# Altium PCB PCB1.pcbdoc
Units mil, origin at the board's own origin, x right, y up, seen from the top; angles counter-clockwise.
Board outline 3045 x 3700 mil, 2 copper layers (Top Layer, Bottom Layer), stack 62.206 mil thick; 58 components, 52 nets, 178 pads, 29 vias.
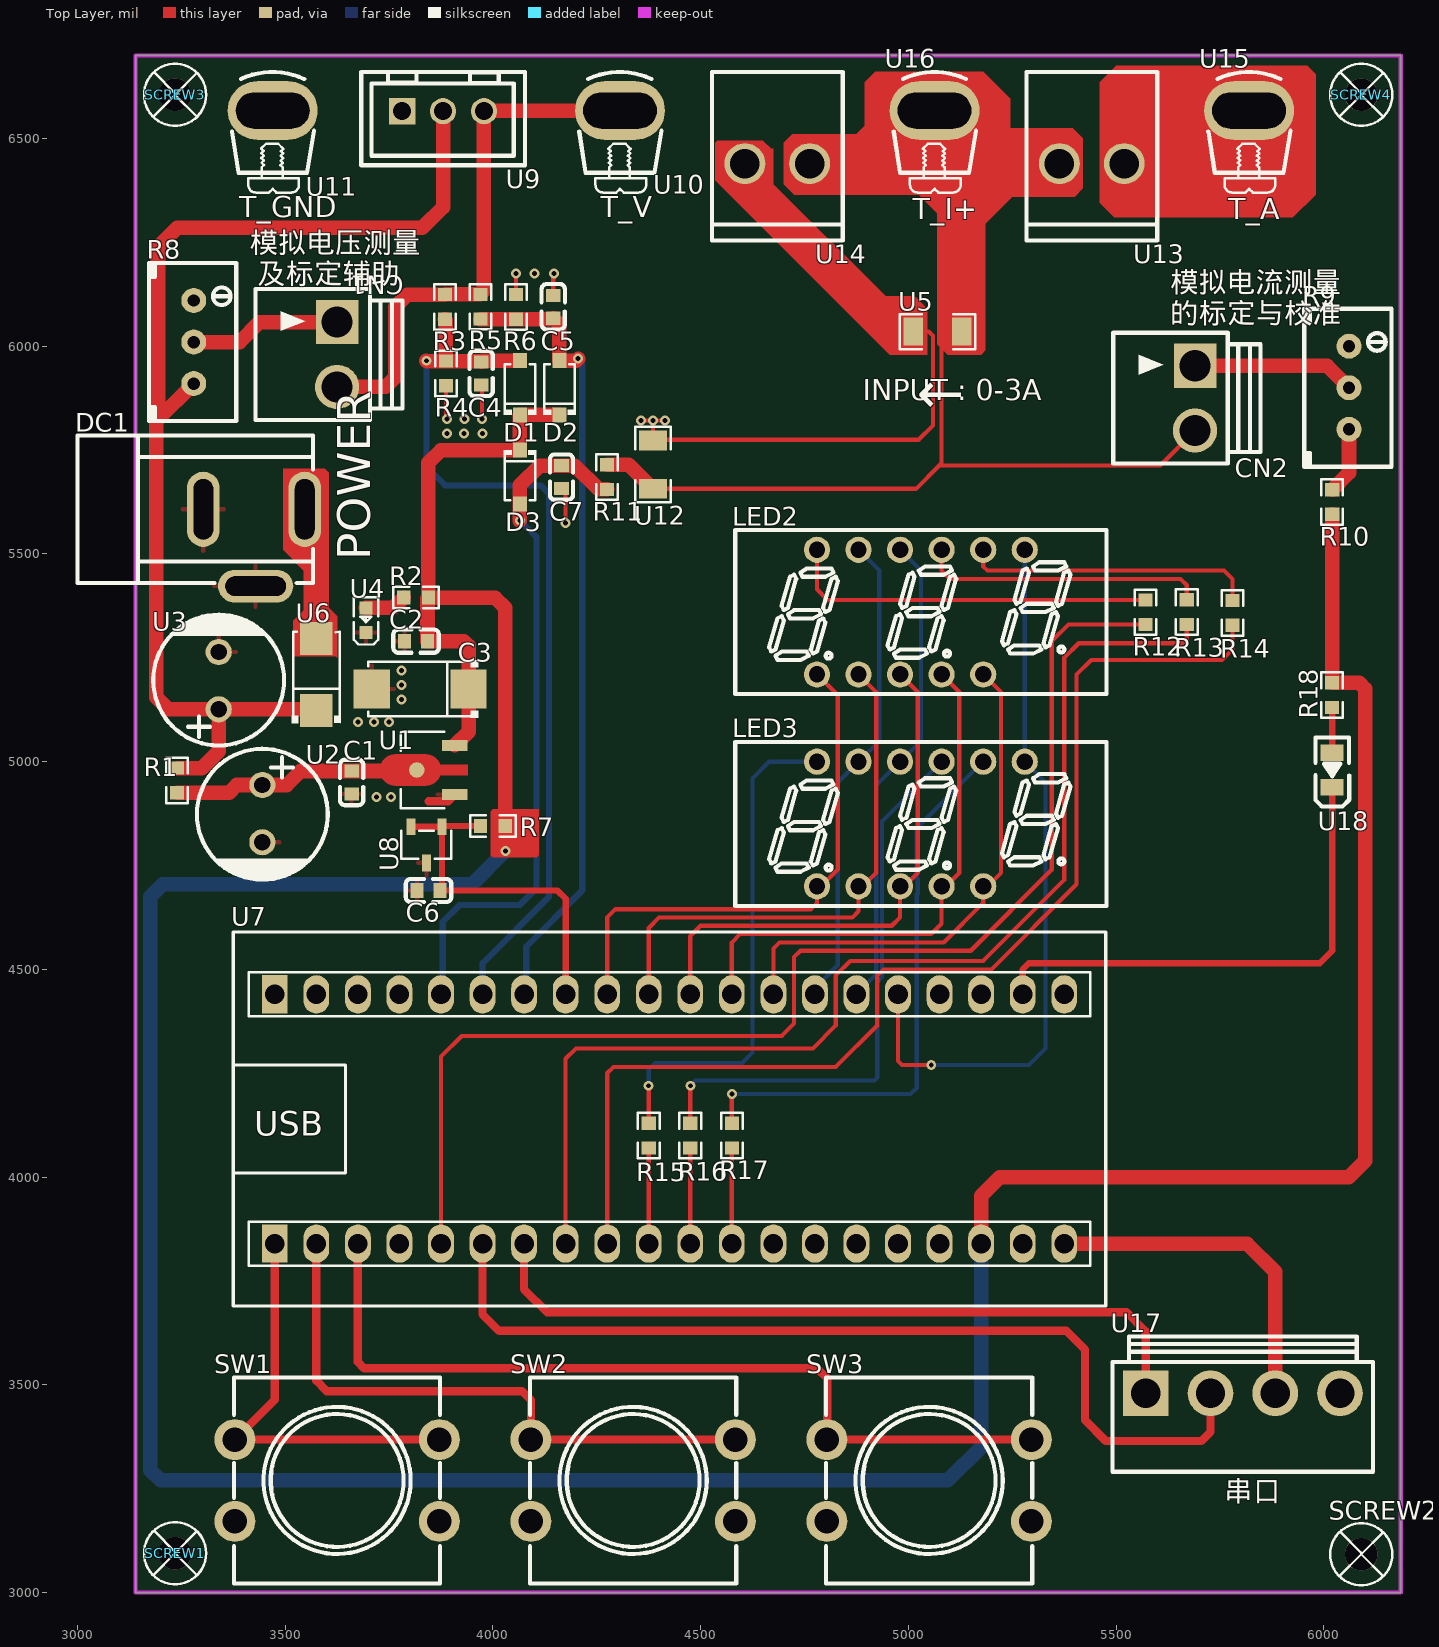
[diagram p0: Top Layer view]
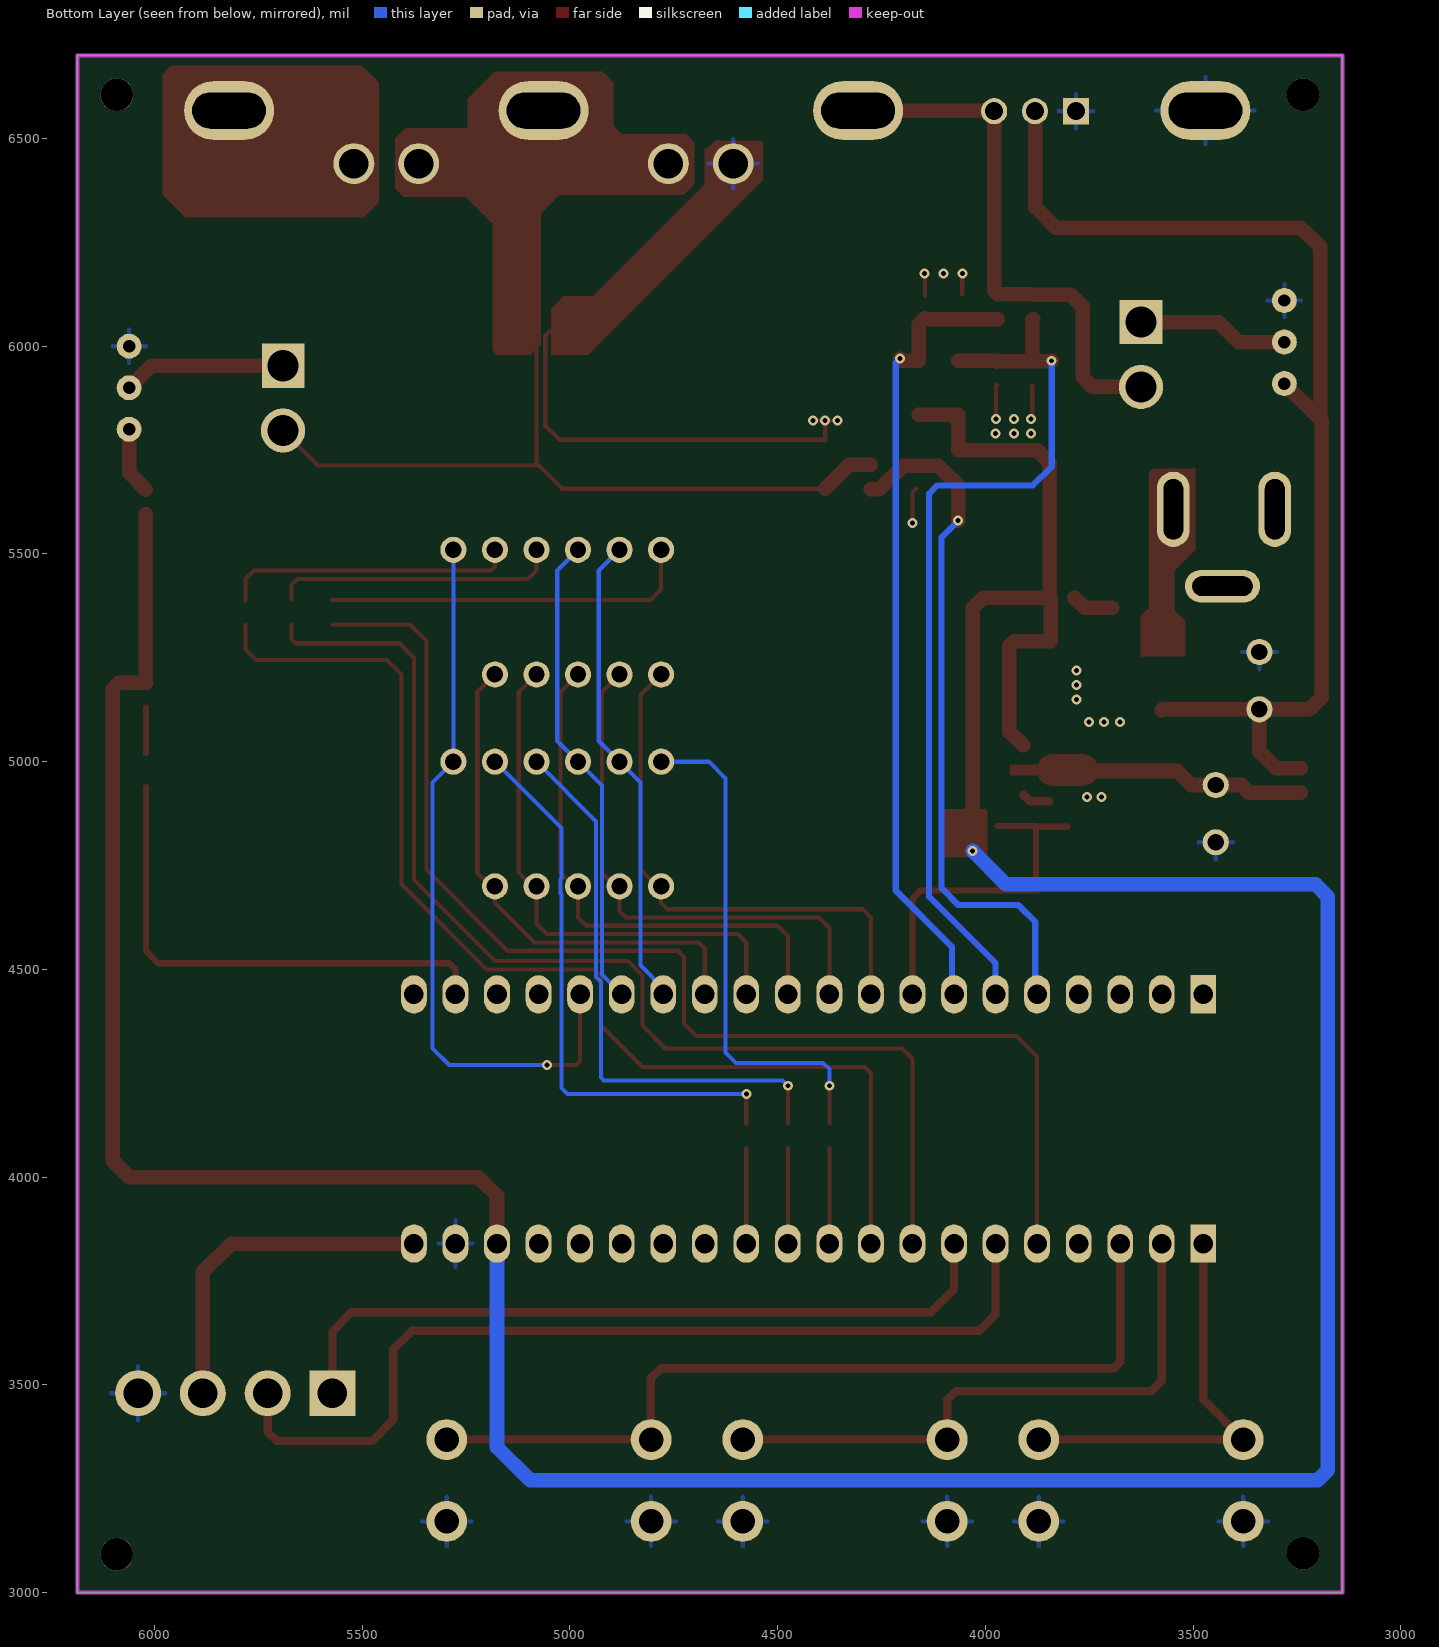
[diagram p1: Bottom Layer view, seen from below]

## Layer stack, top to bottom
Top Solder Mask Layer: solder mask 0.394, Dk 3.3
Top Layer: signal copper 1.379
Dielectric1: surface 59.449, FR4, Dk 4.5
Bottom Layer: signal copper 1.378
Bottom Solder Mask Layer: solder mask 0.394, Dk 3.3

## Board outline
3140.19,6700 3140.19,3000 6185.19,3000 6185.19,6700

## Design rules (kind name [scope] priority, off if disabled: settings)
BoardOutlineClearance copperThickness2oz_1 [All] p2 off: genericclearance=7.99 ignorepadtopadclearanceinfootprint=FALSE except(0: Arc-SplitContinuation Track-SplitContinuation SMDPad-SplitContinuation THPad-SplitContinuation Via-SplitContinuation Fill-SplitContinuation Region-SplitContinuation Poly-SplitContinuation Text-SplitContinuation Hole-SplitContinuation; 5.98: Arc-CutoutEdge SMDPad-CutoutEdge THPad-CutoutEdge Via-CutoutEdge Fill-CutoutEdge Region-CutoutEdge Text-CutoutEdge; 6.93: Hole-OutlineEdge Hole-CutoutEdge; 10: Poly-OutlineEdge Poly-CutoutEdge; 11.81: Arc-OutlineEdge Track-OutlineEdge SMDPad-OutlineEdge THPad-OutlineEdge Via-OutlineEdge Fill-OutlineEdge Region-OutlineEdge Text-OutlineEdge Track-CutoutEdge)
BoardOutlineClearance copperThickness1oz_1 [All] p4: genericclearance=4.02 ignorepadtopadclearanceinfootprint=FALSE except(0: Arc-SplitContinuation Track-SplitContinuation SMDPad-SplitContinuation THPad-SplitContinuation Via-SplitContinuation Fill-SplitContinuation Region-SplitContinuation Poly-SplitContinuation Text-SplitContinuation Hole-SplitContinuation; 6: SMDPad-CutoutEdge THPad-CutoutEdge Via-CutoutEdge Fill-CutoutEdge Region-CutoutEdge Text-CutoutEdge; 6.93: Hole-OutlineEdge Hole-CutoutEdge; 10: Poly-OutlineEdge Poly-CutoutEdge; 11.8: Arc-OutlineEdge Track-OutlineEdge SMDPad-OutlineEdge THPad-OutlineEdge Via-OutlineEdge Fill-OutlineEdge Region-OutlineEdge Text-OutlineEdge; 11.81: Arc-CutoutEdge Track-CutoutEdge)
Clearance copperThickness2oz [All] p1 off: gap=7.99 ignorepadtopadclearanceinfootprint=FALSE except(5.98: SMDPad-Track SMDPad-SMDPad THPad-Track SMDPad-THPad THPad-THPad Track-Via SMDPad-Via THPad-Via Via-Via Fill-Track Region-Track Fill-SMDPad Region-SMDPad Fill-THPad Region-THPad Fill-Via Region-Via Fill-Fill Fill-Region Region-Region Arc-Track Arc-SMDPad Arc-THPad Arc-Via Fill-Arc Region-Arc Arc-Arc Text-Track SMDPad-Text Text-THPad Text-Via Fill-Text Region-Text Arc-Text Text-Text; 6.93: Hole-Track Hole-SMDPad Hole-THPad Hole-Via Fill-Hole Region-Hole Hole-Arc Hole-Text; 10: Poly-Track Poly-SMDPad Poly-THPad Poly-Via Poly-Fill Poly-Region Poly-Poly Poly-Arc Poly-Text Poly-Hole)
Clearance copperThickness1oz [All] p3: gap=4.02 ignorepadtopadclearanceinfootprint=FALSE except(5.98: SMDPad-Track SMDPad-SMDPad THPad-Track SMDPad-THPad THPad-THPad Track-Via SMDPad-Via THPad-Via Via-Via Fill-Track Region-Track Fill-SMDPad Region-SMDPad Fill-THPad Region-THPad Fill-Via Region-Via Fill-Fill Fill-Region Region-Region; 6: Arc-Track Arc-SMDPad Arc-THPad Arc-Via Fill-Arc Region-Arc Arc-Arc Text-Track SMDPad-Text Text-THPad Text-Via Fill-Text Region-Text Arc-Text Text-Text; 6.93: Hole-Track Hole-SMDPad Hole-THPad Hole-Via Fill-Hole Region-Hole Hole-Arc Hole-Text; 10: Poly-Track Poly-SMDPad Poly-THPad Poly-Via Poly-Fill Poly-Region Poly-Poly Poly-Arc Poly-Text Poly-Hole)
Creepage creepage [All] p1: checkdistance=0 ignoreinternallayers=TRUE applytopolygonpour=TRUE
DiffPairsRouting differentialPair [All] p1: maxlimit=6 minlimit=6 mostfreqgap=6 toplayer_minwidth=5 toplayer_prefwidth=10 toplayer_maxwidth=100 toplayer_mingap=6 toplayer_prefgap=6 toplayer_maxgap=6 bottomlayer_minwidth=5 bottomlayer_prefwidth=10 bottomlayer_maxwidth=100 bottomlayer_mingap=6 bottomlayer_prefgap=6 bottomlayer_maxgap=6 maxuncoupledlength=10
HoleToHoleClearance otherClearance [All] p1: gap=11.81 allowstackedmicrovias=TRUE
Length netLength [All] p1: minlimit=0 maxlimit=0
MatchedLengths netLengthTolerance [All] p1: tolerance=1000
PasteMaskExpansion pasteMaskExpansion [All] p1: expansion=0
PlaneConnect innerPlane [All] p1: planeconnectstyle=Relief reliefexpansion=20 reliefentries=4 reliefconductorwidth=10 reliefairgap=10
PolygonConnect copperRegion [(InNet('$1N3') OR InNet('GND'))] p1: connectstyle=Relief reliefconductorwidth=10 reliefentries=4 polygonreliefangle="90 Angle" airgapwidth=10 via.connectstyle=Relief via.reliefconductorwidth=10 via.reliefentries=4 via.polygonreliefangle="90 Angle" via.airgapwidth=10
RoutingVias viaSize [All] p1: holewidth=12.01 width=24.02 viastyle="Through Hole" minholewidth=11.81 minwidth=19.68 maxholewidth=248.03 maxwidth=393.7
SolderMaskExpansion solderMaskExpansion [IsVia] p1: expansion=-1000 istentingtop=TRUE
SolderMaskExpansion solderMaskExpansion [All] p2: expansion=2 istentingtop=FALSE
Width copperThickness2oz_2 [All] p1 off: maxlimit=100 minlimit=8 preferedwidth=10
Width copperThickness1oz_2 [All] p2: maxlimit=100 minlimit=5 preferedwidth=10

## Components (designator, comment, footprint, x,y, rotation, side; value= is the part's Value field where it differs from the comment)
C1 "0.1uF" C0603 3660.19,4950 r90 top
C2 "100nF" C0603 3815.19,5290 r0 top
C3 "100uF 16V" CAP-SMD_L6.0-W3.2-FD 3825.19,5175 r180 top
C4 "10nF" C0603 3971.88,5934.49 r90 top
C5 "10nF" C0603 4145.31,6094.88 r270 top
C6 "100nF" C0603 3845.19,4690 r0 top
C7 "10nF" C0603 4165.19,5685 r90 top
CN1 "JP2D" CONN-TH_2P-P3.96-V 3625.19,5980 r270 top
CN2 "JP2D" CONN-TH_2P-P3.96-V 5690.19,5875 r270 top
D1 "1N4148" SOD-123_L2.7-W1.7-LS3.8-RD 4065.19,5900 r90 top
D2 "1N4148" SOD-123_L2.7-W1.7-LS3.8-RD 4160.19,5900 r90 top
D3 "1N4148" SOD-123_L2.7-W1.7-LS3.8-RD 4065.19,5685 r270 top
DC1 "DC005" DC-IN-TH_DC005 3425.19,5515 r0 top
LED2 "FJ2381AH" LED-SEG-TH_FJ2381AH 5030.19,5360 r0 top
LED3 "FJ2381AH" LED-SEG-TH_FJ2381AH 5030.19,4850 r0 top
R1 "10" R0603 3240.19,4955 r270 top
R2 "10K" R0603 3815.19,5395 r180 top
R3 "220K" R0603 3884.85,6094.66 r90 top
R4 "10K" R0603 3886.88,5934.37 r90 top
R5 "10K" R0603 3970.19,6095 r90 top
R6 "10K" R0603 4055.53,6094.66 r270 top
R7 "10K" R0603 4000.19,4845 r0 top
R8 "10K" RES-ADJ-TH_3296W 3280.19,6010 r0 top
R9 "10K" RES-ADJ-TH_3296W 6060.63,5900 r0 top
R10 "10K" R0603 6020.19,5625 r270 top
R11 "1K" R0603 4275.19,5685 r90 top
R12 "300" R0603 5570.53,5359.66 r90 top
R13 "300" R0603 5670.19,5360 r90 top
R14 "300" R0603 5780.42,5357.98 r90 top
R15 "300" R0603 4375.19,4100 r90 top
R16 "300" R0603 4475.19,4100 r90 top
R17 "300" R0603 4575.19,4100 r90 top
R18 "10K" R0603 6019.85,5160.34 r90 top
SCREW1 "" M2螺丝 3235.19,3094.77 r0 top
SCREW2 "" M2螺丝 6090.19,3092.32 r0 top
SCREW3 "" M2螺丝 3235.19,6605 r0 top
SCREW4 "" M2螺丝 6090.19,6605 r0 top
SW1 "B3F-4055" SW-TH_4P-L12.0-W12.0-P5.00-LS12.5 3625.19,3270 r0 top
SW2 "B3F-4055" SW-TH_4P-L12.0-W12.0-P5.00-LS12.5 4337.69,3270 r0 top
SW3 "B3F-4055" SW-TH_4P-L12.0-W12.0-P5.00-LS12.5 5050.19,3270 r0 top
U1 "SE8550K2-HF" SOT-89-3_L4.5-W2.5-P1.50-LS4.2-BR 3855.19,4980 r0 top
U2 "47uF/50V" CAP-TH_BD8.0-P3.50-D0.6-FD-2 3445.19,4875 r270 top
U3 "47uF/50V" CAP-TH_BD8.0-P3.50-D0.6-FD-2 3340.19,5195 r90 top
U4 "LED_0603" LED0603-RD_RED 3694.82,5340.65 r90 top
U5 "100mΩ" R1206 5070.19,6035 r0 top
U6 "1N5819" SMA_L4.3-W2.6-LS5.1-RD 3575.19,5210 r90 top
U7 "LCKFB-DWX-CW32F030C8T6" DIP-40_L53.34-W15.24-P2.54-LS15.24 4425.19,4140 r270 top
U8 "TL431ACDBZTG4" SOT-23-3_L3.0-W1.7-P0.95-LS2.9-BR 3840.19,4800 r90 top
U9 "XH-3A" CONN-TH_3P-P2.50_C9900023074 3880.19,6565.56 r180 top
U10 "T_V" TH-1_C9900016725 4306.02,6567.24 r0 top
U11 "T_GND" TH-1_C9900016725 3470.19,6567.24 r0 top
U12 "100m/1W" R1206 4385.19,5715 r90 top
U13 "CH3.96-2P直脚" CONN-TH_CH3.96-2P 5441.65,6439.6 r180 top
U14 "CH3.96-2P直脚" CONN-TH_CH3.96-2P 4684.57,6439.6 r180 top
U15 "T_V" TH-1_C9900016725 5820.19,6567.24 r0 top
U16 "T_V" TH-1_C9900016725 5063.11,6567.24 r0 top
U17 "HDR1X4_3.96mm" CONN-TH_4P-P3.96_FWF39601-S04S22W1B 5805.19,3480 r0 top
U18 "LEDGREEN0805" LED0805-R-RD_GREEN 6020.19,4980 r90 top

## Footprints (in the part's own frame and the unit in brackets; to place one, negate y for a bottom-side part, rotate by r counter-clockwise, add the part's x,y. Pads: shape width x height; smd on the part's side, far side on the other; paste and mask are expansions set on the pad)
C0603 [mm]
  rect 0.8x0.9 smd: 1(-0.7,0) 2(0.7,0)
  silkscreen extent -1.39,-0.71 1.39,0.71
CAP-SMD_L6.0-W3.2-FD [mil]
  rect 86.91x93.54 smd: 1(-116.58,0) 2(116.58,0)
  silkscreen extent -140,-69 125,69
CAP-TH_BD8.0-P3.50-D0.6-FD-2 [mm]
  round 1.6 hole 1: 1(-1.75,0) 2(1.75,0)
  silkscreen extent -3.96,-4 4.04,4
CONN-TH_2P-P3.96-V [mm]
  rect 2.7x2.6 hole 1.9: 1(-1.98,0)
  round 2.7 hole 1.9: 2(1.98,0)
  silkscreen extent -4,-5 4,4
CONN-TH_3P-P2.50_C9900023074 [mm]
  rect 1.6x1.6 hole 1.1: 1(2.5,0)
  round 1.6 hole 1.1: 2(0,0) 3(-2.5,0)
  silkscreen extent -5,-2.4 5,3.3
CONN-TH_4P-P3.96_FWF39601-S04S22W1B [mm]
  rect 2.8x2.8 hole 1.8: 1(-5.94,0)
  round 2.8 hole 1.8: 2(-1.98,0) 3(1.98,0) 4(5.94,0)
  silkscreen extent -7.96,-4.8 7.96,3.46
CONN-TH_CH3.96-2P [mm]
  round 2.5 hole 1.8 paste+0 mask+0.05: 1(-1.98,0) 2(1.98,0)
  silkscreen extent -4,-5.6 4,4.7
DC-IN-TH_DC005 [mm]
  oval 2x4.6 hole 1.2 slot 3.7 at 90 deg: 1(3.1,2.35) 2(-3.1,2.35)
  oval 4.6x2 hole 1.2 slot 3.7 at 0 deg: 3(0.1,-2.35)
  silkscreen extent -10.8,-2.15 3.6,6.85
DIP-40_L53.34-W15.24-P2.54-LS15.24 [mm]
  oval 2.337x1.575 hole 1.194: 1(-7.62,24.13) 2(-7.62,21.59) 3(-7.62,19.05) 4(-7.62,16.51) 5(-7.62,13.97) 6(-7.62,11.43) 7(-7.62,8.89) 8(-7.62,6.35) 9(-7.62,3.81) 10(-7.62,1.27) 11(-7.62,-1.27) 12(-7.62,-3.81) 13(-7.62,-6.35) 14(-7.62,-8.89) 15(-7.62,-11.43) 16(-7.62,-13.97) 17(-7.62,-16.51) 18(-7.62,-19.05) 19(-7.62,-21.59) 22(7.62,-21.59) 23(7.62,-19.05) 24(7.62,-16.51) 25(7.62,-13.97) 26(7.62,-11.43) 27(7.62,-8.89) 28(7.62,-6.35) 29(7.62,-3.81) 30(7.62,-1.27) 31(7.62,1.27) 32(7.62,3.81) 33(7.62,6.35) 34(7.62,8.89) 35(7.62,11.43) 36(7.62,13.97) 37(7.62,16.51) 38(7.62,19.05) 39(7.62,21.59) 40(7.62,24.13)
  rect 2.337x1.575 hole 1.194: 20(-7.62,-24.13) 21(7.62,-24.13)
  silkscreen extent -11.43,-26.67 11.43,26.67
LED0603-RD_RED [mm]
  rect 0.8x0.8 smd: 1(-0.749,-0.003) 2(0.749,0.003)
  silkscreen extent -1.49,-0.75 1.39,0.76
LED0805-R-RD_GREEN [mm]
  rect 1x1.4 smd: 1(1.05,0) 2(-1.05,0)
  silkscreen extent -2.22,-1.04 1.99,1.01
LED-SEG-TH_FJ2381AH [mm]
  round 1.6 hole 1: 1(-6.35,-3.81) 2(-3.81,-3.81) 3(-1.27,-3.81) 4(1.27,-3.81) 5(3.81,-3.81) 7(6.35,3.81) 8(3.81,3.81) 9(1.27,3.81) 10(-1.27,3.81) 11(-3.81,3.81) 12(-6.35,3.81)
  silkscreen extent -11.35,-5.01 11.35,5.01
M2螺丝 [mm]
  round 2 hole 2: 1(0,0)
  silkscreen extent -1.9,-1.9 1.9,1.9
R0603 [mil]
  rect 31.75x34.02 smd paste-3937.01 mask+2: 1(-29.66,0) 2(29.66,0)
  silkscreen extent -55,-26 55,26
R1206 [mil]
  rect 47.54x66.97 smd paste-3937.01 mask+2: 1(-58.22,0) 2(58.22,0)
  silkscreen extent -91,-42 91,42
RES-ADJ-TH_3296W [mil]
  round 60 hole 30: 1(0,100.01) 2(0,0.01) 3(0,-99.99)
  silkscreen extent -108,-190 102,190
SMA_L4.3-W2.6-LS5.1-RD [mm]
  rect 2x2 smd: 1(-2.2,0) 2(2.2,0)
  silkscreen extent -2.98,-1.5 2.6,1.5
SOD-123_L2.7-W1.7-LS3.8-RD [mm]
  rect 0.91x0.84 smd: 1(-1.655,0) 2(1.655,0)
  silkscreen extent -1.65,-1 1.43,1
SOT-23-3_L3.0-W1.7-P0.95-LS2.9-BR [mil]
  rect 40.85x20.95 smd: 1(43.36,-37.4) 2(43.36,37.4) 3(-43.36,0)
  silkscreen extent -34,-60 34,60
SOT-89-3_L4.5-W2.5-P1.50-LS4.2-BR [mm]
  rect 1.575x0.672 smd paste+0 mask+0.051: 1(1.356,-1.5) 3(1.356,1.5)
  round 0.95 smd: 2(-0.966,0)
  Top Layer region: -2.283,0.95 -0.429,0.95 -0.384,0.949 -0.34,0.946 -0.296,0.94 -0.252,0.933 -0.208,0.924 -0.165,0.912 -0.123,0.899 -0.081,0.884 -0.04,0.866 0,0.847 0.04,0.826 0.078,0.803 0.115,0.779 0.151,0.752 0.185,0.724 0.219,0.695 0.251,0.664 0.281,0.631 0.31,0.597 0.337,0.562 0.362,0.525 0.386,0.488 0.408,0.449 0.428,0.409 0.447,0.33 2.144,0.33 2.144,-0.33 0.447,-0.33 0.428,-0.409 0.408,-0.449 0.386,-0.488 0.362,-0.526 0.337,-0.562 0.31,-0.597 0.281,-0.631 0.251,-0.664 0.219,-0.695 0.185,-0.725 0.151,-0.753 0.115,-0.779 0.078,-0.804 0.04,-0.827 0,-0.848 -0.04,-0.867 -0.081,-0.884 -0.123,-0.899 -0.165,-0.913 -0.208,-0.924 -0.252,-0.934 -0.296,-0.941 -0.34,-0.946 -0.384,-0.949 -0.429,-0.95 -2.283,-0.95 -2.328,-0.949 -2.372,-0.946 -2.416,-0.941 -2.46,-0.934 -2.504,-0.924 -2.547,-0.913 -2.589,-0.899 -2.631,-0.884 -2.672,-0.867 -2.713,-0.848 -2.752,-0.827 -2.79,-0.804 -2.827,-0.779 -2.863,-0.753 -2.898,-0.725 -2.931,-0.695 -2.963,-0.664 -2.993,-0.631 -3.022,-0.597 -3.049,-0.562 -3.075,-0.526 -3.098,-0.488 -3.12,-0.449 -3.141,-0.409 -3.159,-0.369 -3.175,-0.327 -3.189,-0.285 -3.202,-0.242 -3.212,-0.199 -3.22,-0.155 -3.227,-0.111 -3.231,-0.067 -3.233,-0.022 -3.233,0.022 -3.231,0.067 -3.227,0.111 -3.22,0.155 -3.212,0.199 -3.202,0.242 -3.189,0.285 -3.175,0.327 -3.159,0.369 -3.141,0.409 -3.12,0.449 -3.098,0.488 -3.075,0.525 -3.049,0.562 -3.022,0.597 -2.993,0.631 -2.963,0.664 -2.931,0.695 -2.898,0.724 -2.863,0.752 -2.827,0.779 -2.79,0.803 -2.752,0.826 -2.713,0.847 -2.672,0.866 -2.631,0.884 -2.589,0.899 -2.547,0.912 -2.504,0.924 -2.46,0.933 -2.416,0.94 -2.372,0.946 -2.328,0.949
  silkscreen extent -1.95,-2.33 0.7,2.33
SW-TH_4P-L12.0-W12.0-P5.00-LS12.5 [mm]
  round 2.5 hole 1.5: 1(-6.25,2.5) 2(6.25,2.5) 3(-6.25,-2.5) 4(6.25,-2.5)
  silkscreen extent -6.3,-6.3 6.3,6.3
TH-1_C9900016725 [mm]
  oval 5.5x3.6 hole 2.2 slot 4.5 at 0 deg paste+0 mask+0.05: 1(0,0)
  silkscreen extent -2.49,-5.02 2.53,2.35

## Via types
v1: diameter 24.02, hole 12, Top Layer to Bottom Layer, 29 vias

## Nets (pads, with @x,y where several pads share a name; then routed paths per layer and width w, separated by ;. In a path a pad name is that pad's centre, name@x,y a point inside that pad or via, vN(x,y) a via of type N, cw(c..) or ccw(c..) an arc to the next point about the centre after c; other vN are vias at no path point)
3.3V: U7.40 U17.3 | length 828.1
  Top Layer w35: U7.40 5815.19,3840 5883.14,3772.05 U17.3
$1N3: DC1.1 U6.2
$1N5: C1.2 R1.2 U1.2 U2.1 | length 584.2
  Top Layer w35: R1.2 3365.53,4925.34 3384.09,4943.9 U2.1 3504.09,4943.9 3537.75,4977.56 C1.2 3799.36,4977.56 U1.2@3801.8,4979.99
$1N8: R2.2 U4.2 | length 101.2
  Top Layer w35: U4.2 3760.67,5370.14 R2.2
$1N91: CN1.1 R8.2 | length 364.9
  Top Layer w35: R8.2 3390.19,6010 3438.15,6057.95 CN1.1
$1N93: R9.3 R10.1 | length 162.1
  Top Layer w35: R10.1 6060.63,5695.1 R9.3
$1N95: CN2.1 R9.2 | length 392.4
  Top Layer w35: CN2.1 6007.68,5952.95 R9.2
$1N110: U13.1 U15.1
$1N128: LED2.12 R12.2 | length 896
  Top Layer w10: LED2.12 4780.19,5415 4805.87,5389.32 R12.2
$1N129: LED2.9 R13.2 | length 689.8
  Top Layer w10: LED2.9 5080.19,5460 5100.19,5440 5655.19,5440 5670.19,5425 R13.2
$1N130: LED2.8 R14.2 | length 704.9
  Top Layer w10: LED2.8 5180.19,5470 5190.19,5460 5760.19,5460 5780.19,5440 5780.19,5387.87 R14.2
$1N137: LED3.8 R17.2 | length 1374.9
  Top Layer w10: R17.2 v1(4575.19,4200)
  Bottom Layer w10: v1(4575.19,4200) 5005.19,4200 5020.19,4215 5020.19,4679.92 5022.67,4682.4 5022.67,4717.6 5020.19,4720.08 5020.19,4840 LED3.8
$1N138: LED3.9 R16.2 | length 1372.8
  Top Layer w10: R16.2 v1(4475.19,4220)
  Bottom Layer w10: v1(4475.19,4220) 4488.12,4232.93 4918.12,4232.93 4925.19,4240 4925.19,4470.18 4936.69,4481.67 4936.69,4856.5 LED3.9
$1N139: LED3.12 R15.2 | length 1228.5
  Top Layer w10: R15.2 v1(4375.19,4220)
  Bottom Layer w10: v1(4375.19,4220) 4375.19,4260 4390.19,4275 4600.19,4275 4625.19,4300 4625.19,4960 4665.19,5000 LED3.12
$1N147: R18.1 U18.1 | length 109.5
  Top Layer w15: R18.1 6020.19,5130.34 U18.1
+5V: C2.2 C3.1 D1.1 D2.1 D3.1 R2.1 R7.2 R10.2 R18.2 U1.3 U7.38 | length 9437
  Top Layer w35: U1.3 3941.77,5072.24 C3.1 3941.77,5278.42 3930.19,5290 C2.2 3842.75,5392.9 R2.1 ; R7.2 4030.19,4845.34 4030.19,5370 4005.19,5395 R2.1 ; D2.1 D1.1 D3.1 4065.03,5750 3875.19,5750 3844.85,5719.66 R2.1 ; U7.38 5175.19,3955 5220.19,4000 6060.19,4000 6100.19,4040 6100.19,5175 6085.19,5190 R18.2 6020.19,5190.34 R10.2
  Bottom Layer w35: v1(4030.19,4785) 3950.19,4705 3205.19,4705 3175.45,4675.25 3175.45,3294.75 3200.19,3270 5095.19,3270 5175.19,3350 U7.38
+V: CN1.2 R3.2 R5.2 U9.3 U10.1 | length 1309.3
  Top Layer w35: CN1.2 3742.24,5902.05 3765.19,5925 3765.19,6095 3794.51,6124.32 R3.2 3885.19,6124.66 R5.2 3978.61,6133.08 U9.3 3980.29,6567.24 U10.1
A: LED2.11 LED3.11 U7.7 | length 1154.9
  Bottom Layer w10: U7.7 4775.19,4455 4830.19,4510 4830.19,4950 LED3.11 4930.19,5050 4930.19,5460 LED2.11
ADC_IN8: C6.2 R7.1 U7.13 U8.1 U8.2 | length 864.5
  Top Layer w15: U8.2 U8.1 ; R7.1 3879.23,4845 U8.1 ; U7.13 4175.19,4670 4155.19,4690 C6.2 3877.59,4694.84 U8.1
ADC_IN9: C5.2 D2.2 R5.1 R6.2 U7.14 | length 1923.7
  Top Layer w35: R5.1 4055.19,6065.34 R6.2 4142.99,6065 C5.2 4160.19,6052.44 D2.2 4200.35,5965.16 v1(4205.19,5970)
  Bottom Layer w15: U7.14 4080.19,4445 4080.19,4555 4215.19,4690 4215.19,5960 v1(4205.19,5970)
ADC_IN11: C4.2 D1.2 R3.1 R4.2 U7.15 | length 2177.5
  Top Layer w35: v1(3840.19,5965) 3841.16,5964.03 R4.2 ; R3.1 3886.88,6062.98 R4.2 ; D1.2 3974.99,5965.16 C4.2 3969.9,5964.03 R4.2
  Bottom Layer w15: v1(3840.19,5965) 3840.19,5710 3885.19,5665 4115.19,5665 4135.19,5645 4135.19,4675 3975.19,4515 U7.15
ADC_IN12: C7.2 D3.2 R11.1 U7.16 | length 1675.2
  Top Layer w35: v1(4065.19,5580) D3.2 4065.19,5665 4112.75,5712.56 C7.2 4197.63,5712.56 4254.85,5655.34 R11.1
  Bottom Layer w15: U7.16 3879.59,4444.39 3879.59,4614.39 3920.19,4655 4065.19,4655 4105.19,4695 4105.19,5540 v1(4065.19,5580)
B: LED2.7 LED3.7 U7.5 | length 1756.4
  Top Layer w10: U7.5 4975.19,4280 4985.19,4270 v1(5055.19,4270)
  Bottom Layer w10: v1(5055.19,4270) 5290.19,4270 5330.19,4310 5330.19,4950 LED3.7 LED2.7
C: LED2.4 LED3.4 U7.9 | length 1289.7
  Top Layer w10: U7.9 4575.19,4565 4595.19,4585 5055.19,4585 5080.19,4610 LED3.4 5090.19,4700 5122.67,4732.48 5122.67,5167.52 LED2.4
COM1: R12.1 U7.25 | length 2992
  Top Layer w10: U7.25 3875.19,4290 3925.19,4340 4695.19,4340 4725.19,4370 4725.19,4530 4740.19,4545 5150.19,4545 5345.19,4740 5345.19,5290 5385.19,5330 R12.1
COM2: R13.1 U7.28 | length 2777.4
  Top Layer w10: U7.28 4175.19,4285 4200.19,4310 4770.19,4310 4825.19,4365 4825.19,4485 4860.19,4520 5180.19,4520 5375.19,4715 5375.19,5250 5410.19,5285 5660.19,5285 5670.19,5295 R13.1
COM3: R14.1 U7.29 | length 2762
  Top Layer w10: U7.29 4275.19,4250 4290.19,4265 4825.19,4265 4925.19,4365 4925.19,4485 4940.19,4500 5200.19,4500 5405.19,4705 5405.19,5210 5440.19,5245 5755.19,5245 5780.42,5270.23 R14.1
COM4: R15.1 U7.30 | length 230.3
  Top Layer w10: U7.30 R15.1
COM5: R16.1 U7.31 | length 230.3
  Top Layer w10: U7.31 R16.1
COM6: R17.1 U7.32 | length 230.3
  Top Layer w10: U7.32 R17.1
D: LED2.2 LED3.2 U7.11 | length 1292.6
  Top Layer w10: U7.11 4375.19,4600 4400.19,4625 4865.19,4625 4880.19,4640 LED3.2 4890.19,4700 4922.67,4732.48 4922.67,5167.52 LED2.2
DP: LED2.3 LED3.3 U7.10 | length 1289.7
  Top Layer w10: U7.10 4475.19,4580 4500.19,4605 4960.19,4605 4980.19,4625 LED3.3 4990.19,4700 5022.67,4732.48 5022.67,5167.52 LED2.3
E: LED2.1 LED3.1 U7.12 | length 1301.8
  Top Layer w10: U7.12 4275.19,4625 4295.19,4645 4765.19,4645 4780.19,4660 LED3.1 4790.19,4700 4830.19,4740 4830.19,5160 LED2.1
F: LED2.10 LED3.10 U7.6 | length 1154.9
  Bottom Layer w10: U7.6 4922.67,4487.48 4922.67,4942.48 LED3.10 5030.19,5050 5030.19,5460 LED2.10
G: LED2.5 LED3.5 U7.8 | length 1251.6
  Top Layer w10: U7.8 4675.19,4550 4690.19,4565 5085.19,4565 5180.19,4660 LED3.5 5190.19,4700 5222.67,4732.48 5222.67,5167.52 LED2.5
GND: C1.1 C2.1 C3.2 C4.1 C5.1 C6.1 C7.1 DC1.2 DC1.3 R4.1 R6.1 R8.1 R9.1 SW1.3 SW1.4 SW2.3 SW2.4 SW3.3 SW3.4 U1.1 U2.2 U3.2 U4.1 U5.1 U7.39 U8.3 U9.1 U11.1 U12.2 U14.2 U17.4 | length 1486.4
  Top Layer w10: R4.1 3886.88,5828.32 v1(3890.19,5825) ; C4.1 3973.8,5905.01 v1(3973.8,5825) ; v1(4055.19,6175) 4055.53,6174.66 R6.1 ; C5.1 4145.31,6173.56 v1(4146.75,6175) ; C7.1 4175.19,5647.44 v1(4175.19,5575) ; v1(4356.14,5821.1) v1(4385.19,5821.1) ; v1(4414.07,5821.1) v1(4385.19,5821.1) ; U5.1 5049.21,6035 5059.21,6025 5059.21,5809.02 5025.19,5775 4386.97,5775 U12.2 v1(4385.19,5821.1)
  Top Layer w20: 3845.19,4905 3892.64,4905 U1.1@3908.59,4920.94
  other v1: 3720.19,4915 3755.19,4915 3675.19,5095 3714.15,5095 3750.19,5095 3780.19,5150 3780.19,5185 3780.19,5220 3890.19,5790 3930.48,5790 3975.19,5790 3931.25,5825 4100.19,6175
I+: CN2.2 R11.2 U5.2 U12.1 U13.2 U14.1 U16.1 | length 1863.6
  Top Layer w10: U12.1 5018.04,5656.78 5074.48,5713.22 ; U5.2 5090.19,6035 5080.19,6025 5080.19,5718.94 5074.48,5713.22 ; CN2.2 5606.37,5713.22 5074.48,5713.22
  Top Layer w35: R11.2 4327.31,5714.66 U12.1
K1: SW1.1 SW1.2 U7.21 | length 1003.5
  Top Layer w20: U7.21 3475.19,3464.49 SW1.1 SW1.2
K2: SW2.1 SW2.2 U7.22 | length 1452.9
  Top Layer w20: U7.22 3575.19,3510 3600.19,3485 4070.19,3485 4091.63,3463.56 SW2.1 SW2.2
K3: SW3.1 SW3.2 U7.23 | length 2070.7
  Top Layer w20: U7.23 3675.19,3555 3690.19,3540 4780.19,3540 4805.19,3515 4805.19,3369.49 SW3.1 SW3.2
LED1: U7.2 U18.2 | length 1217.3
  Top Layer w15: U7.2 5275.19,4500 5290.19,4515 5990.19,4515 6020.19,4545 U18.2
MCU_RX: U7.27 U17.1 | length 1796.9
  Top Layer w20: U7.27 4075.19,3730 4130.19,3675 5525.19,3675 5571.33,3628.86 U17.1
MCU_TX: U7.26 U17.2 | length 2250.1
  Top Layer w20: U7.26 3975.19,3670 4015.19,3630 5380.19,3630 5425.19,3585 5425.19,3415 5475.19,3365 5705.19,3365 5727.24,3387.05 U17.2
PB5: U7.33
PB6: U7.34
PB7: U7.35
PB8: U7.36
PB9: U7.37
PB15: U7.24
PC14: U7.3
PC15: U7.4
VP: R1.1 R8.3 U3.1 U6.1 U9.2 | length 2779.7
  Top Layer w35: R1.1 3299.85,4984.66 3340.19,5025 U3.1 ; R8.3 3194.05,5823.85 ; U6.1 3572.48,5126.1 U3.1 ; U9.2 3880.18,6334.99 3830.19,6285 3240.19,6285 3194.05,6238.85 3194.05,5823.85 ; 3194.05,5823.85 3190.19,5820 3190.19,5155 3219.09,5126.1 U3.1
pads on no net: SCREW1.1 SCREW2.1 SCREW3.1 SCREW4.1 U7.1 U7.17 U7.18 U7.19 U7.20

## Polygon pours and split planes (outlines as drawn)
GND on Top Layer (solid, remove dead copper, pour order 0): 3525.19,5395 3465.19,5335 3465.19,5250 3435.19,5220 3315.19,5220 3290.8,5244.39 3290.8,5290.05 3280.19,5300.66 3280.19,5465 3230.19,5515 3230.19,5690 3255.19,5715 3340.19,5715 3380.19,5675 3380.19,5495 3480.19,5495 3525.19,5450
GND on Bottom Layer (solid, remove dead copper, pour order 12): 3455.19,4855 3485.19,4855 3500.19,4840 3500.19,4770 3473.3,4743.11 3222.08,4743.11 3175.19,4790 3175.19,5260 3225.19,5310 3380.19,5310 3385.19,5315 3400.19,5300 3400.19,5220 3373.24,5193.05 3258.24,5193.05 3235.19,5170 3235.19,4866.75 3246.97,4854.98 3455.22,4854.98
GND on Top Layer (solid, remove dead copper, pour order 2): 3611.9,4950 3698.41,4950 3698.41,4890.75 3564.55,4756.89 3418.3,4756.89 3400.19,4775 3400.19,4840 3415.19,4855 3516.9,4855
GND on Top Layer (solid, remove dead copper, pour order 4): 3945.19,4940 3945.19,4895 3941.62,4891.42 3816.73,4891.42 3795.24,4869.93 3632.24,4869.93 3632.24,4932.96 3630.19,4935 3635.19,4940
GND on Top Layer (solid, remove dead copper, pour order 6): 3655.19,5120 3655.19,5325 3660.19,5330 3800.19,5330 3805.19,5325 3805.19,5150 3775.19,5120
GND on Bottom Layer (solid, remove dead copper, pour order 14): 3767.28,5109.01 3767.28,5069.56 3755.19,5057.48 3755.19,4900 3705.19,4900 3705.19,5000 3660.19,5045 3660.19,5109.01
GND on Top Layer (solid, remove dead copper, pour order 8): 3795.19,5165 3795.19,5105 3765.19,5075 3660.19,5075 3660.19,5110 3664.1,5113.91 3750.19,5113.91 3765.19,5128.91 3765.19,5160 3770.19,5165
GND on Top Layer (solid, remove dead copper, pour order 10): 3770.19,4935 3781.43,4923.77 3781.43,4891.42 3765.19,4875.19 3765.19,4790 3770.19,4785 3855.19,4785 3855.19,4730 3840.19,4715 3840.19,4645 3835.19,4640 3760.19,4640 3705.19,4695 3705.19,4930 3710.19,4935
GND on Bottom Layer (solid, remove dead copper, pour order 16): 3165.19,6685 6135.19,6685 6155.19,6665 6155.19,3060.51 6143.09,3048.4 3216.8,3048.4 3210.19,3055 3210.19,3400 3290.19,3480 5385.19,3480 5810.19,3905 5810.19,5660 4505.19,5660 4405.19,5560 3765.19,5560 3560.19,5765 3560.19,5815 3190.19,5815 3185.19,5820 3185.19,6665
GND on Bottom Layer (solid, remove dead copper, pour order 18): 3820.19,5605 3800.19,5585 3800.19,5205 3765.19,5205 3740.19,5230 3740.19,5605
GND on Bottom Layer (solid, remove dead copper, pour order 20): 5395.19,3445 5335.19,3385 5235.19,3385 5220.19,3400 5220.19,3910 5225.19,3915 5310.19,3915 5395.19,3830

## Keep-outs
Board Outline Layer:
  the board outline again, w10

## Other copper
Top Layer:
  region net $1N3: 3595.19,5705 3605.19,5695 3605.19,5370 3625.19,5350 3625.19,5250 3621.65,5253.54 3519.05,5253.54 3519.05,5338.85 3545.19,5365 3545.19,5460 3495.19,5510 3495.19,5705
  region net $1N110: 5960.19,6675 5980.19,6655 5980.19,6365 5925.19,6310 5495.19,6310 5460.19,6345 5460.19,6635 5500.19,6675
  region net +5V: 4000.19,4886 4110.19,4886 4110.19,4775 4105.19,4770 4000.19,4770 3995.19,4775 3995.19,4880 4000.19,4885
  region net I+: 5095.19,5980 5070.19,6005 5070.19,6320 5025.19,6365 4725.19,6365 4700.19,6390 4700.19,6490 4720.19,6510 4875.19,6510 4895.19,6530 4895.19,6635 4920.19,6660 5180.19,6660 5245.19,6595 5245.19,6525 5395.19,6525 5420.19,6500 5420.19,6380 5400.19,6360 5250.19,6360 5185.19,6295 5185.19,5990 5175.19,5980
  region net GND: 4650.19,6495 4670.19,6475 4675.19,6475 4675.19,6390 4945.19,6120 5015.19,6120 5045.19,6090 5045.19,5980 4955.19,5980 4535.19,6400 4535.19,6490 4540.19,6495

## Silkscreen, mask and mechanical layers (free items; w line width, h text height)
Top Silkscreen Layer:
  text "T_GND" at 3390.19,6310 h50
  text "T_V" at 4260.19,6310 h50
  text "T_I+" at 5010.19,6305 h50
  text "T_A" at 5770.19,6305 h50
  text "模拟电压测量 /  及标定辅助" at 3415.19,6150 h50
  text "模拟电流测量 / 的标定与校准" at 5630.19,6055 h50
  text "INPUT : 0-3A" at 4890.19,5870 h50
  text "←" at 5020.19,5840 h100
  text "POWER" at 3705.19,5485 h80 r90
  text "串口" at 5760.19,3220 h50

## Text inside footprints (layer, text, board x,y; h text height)
U7: Document Layer "USB" at 3425.19,4100 h59.05; Top Silkscreen Layer "USB" at 3425.19,4100 h59.05